# Altium PCB Mega2560_Custom.PcbDoc (part 2 of 6)
Units mil, origin at the board's own origin, x right, y up, seen from the top; angles counter-clockwise.
Board outline 4742.41 x 2889.95 mil, 2 copper layers (Top Layer, Bottom Layer), stack 57 mil thick; 215 components, 134 nets, 793 pads, 779 vias.
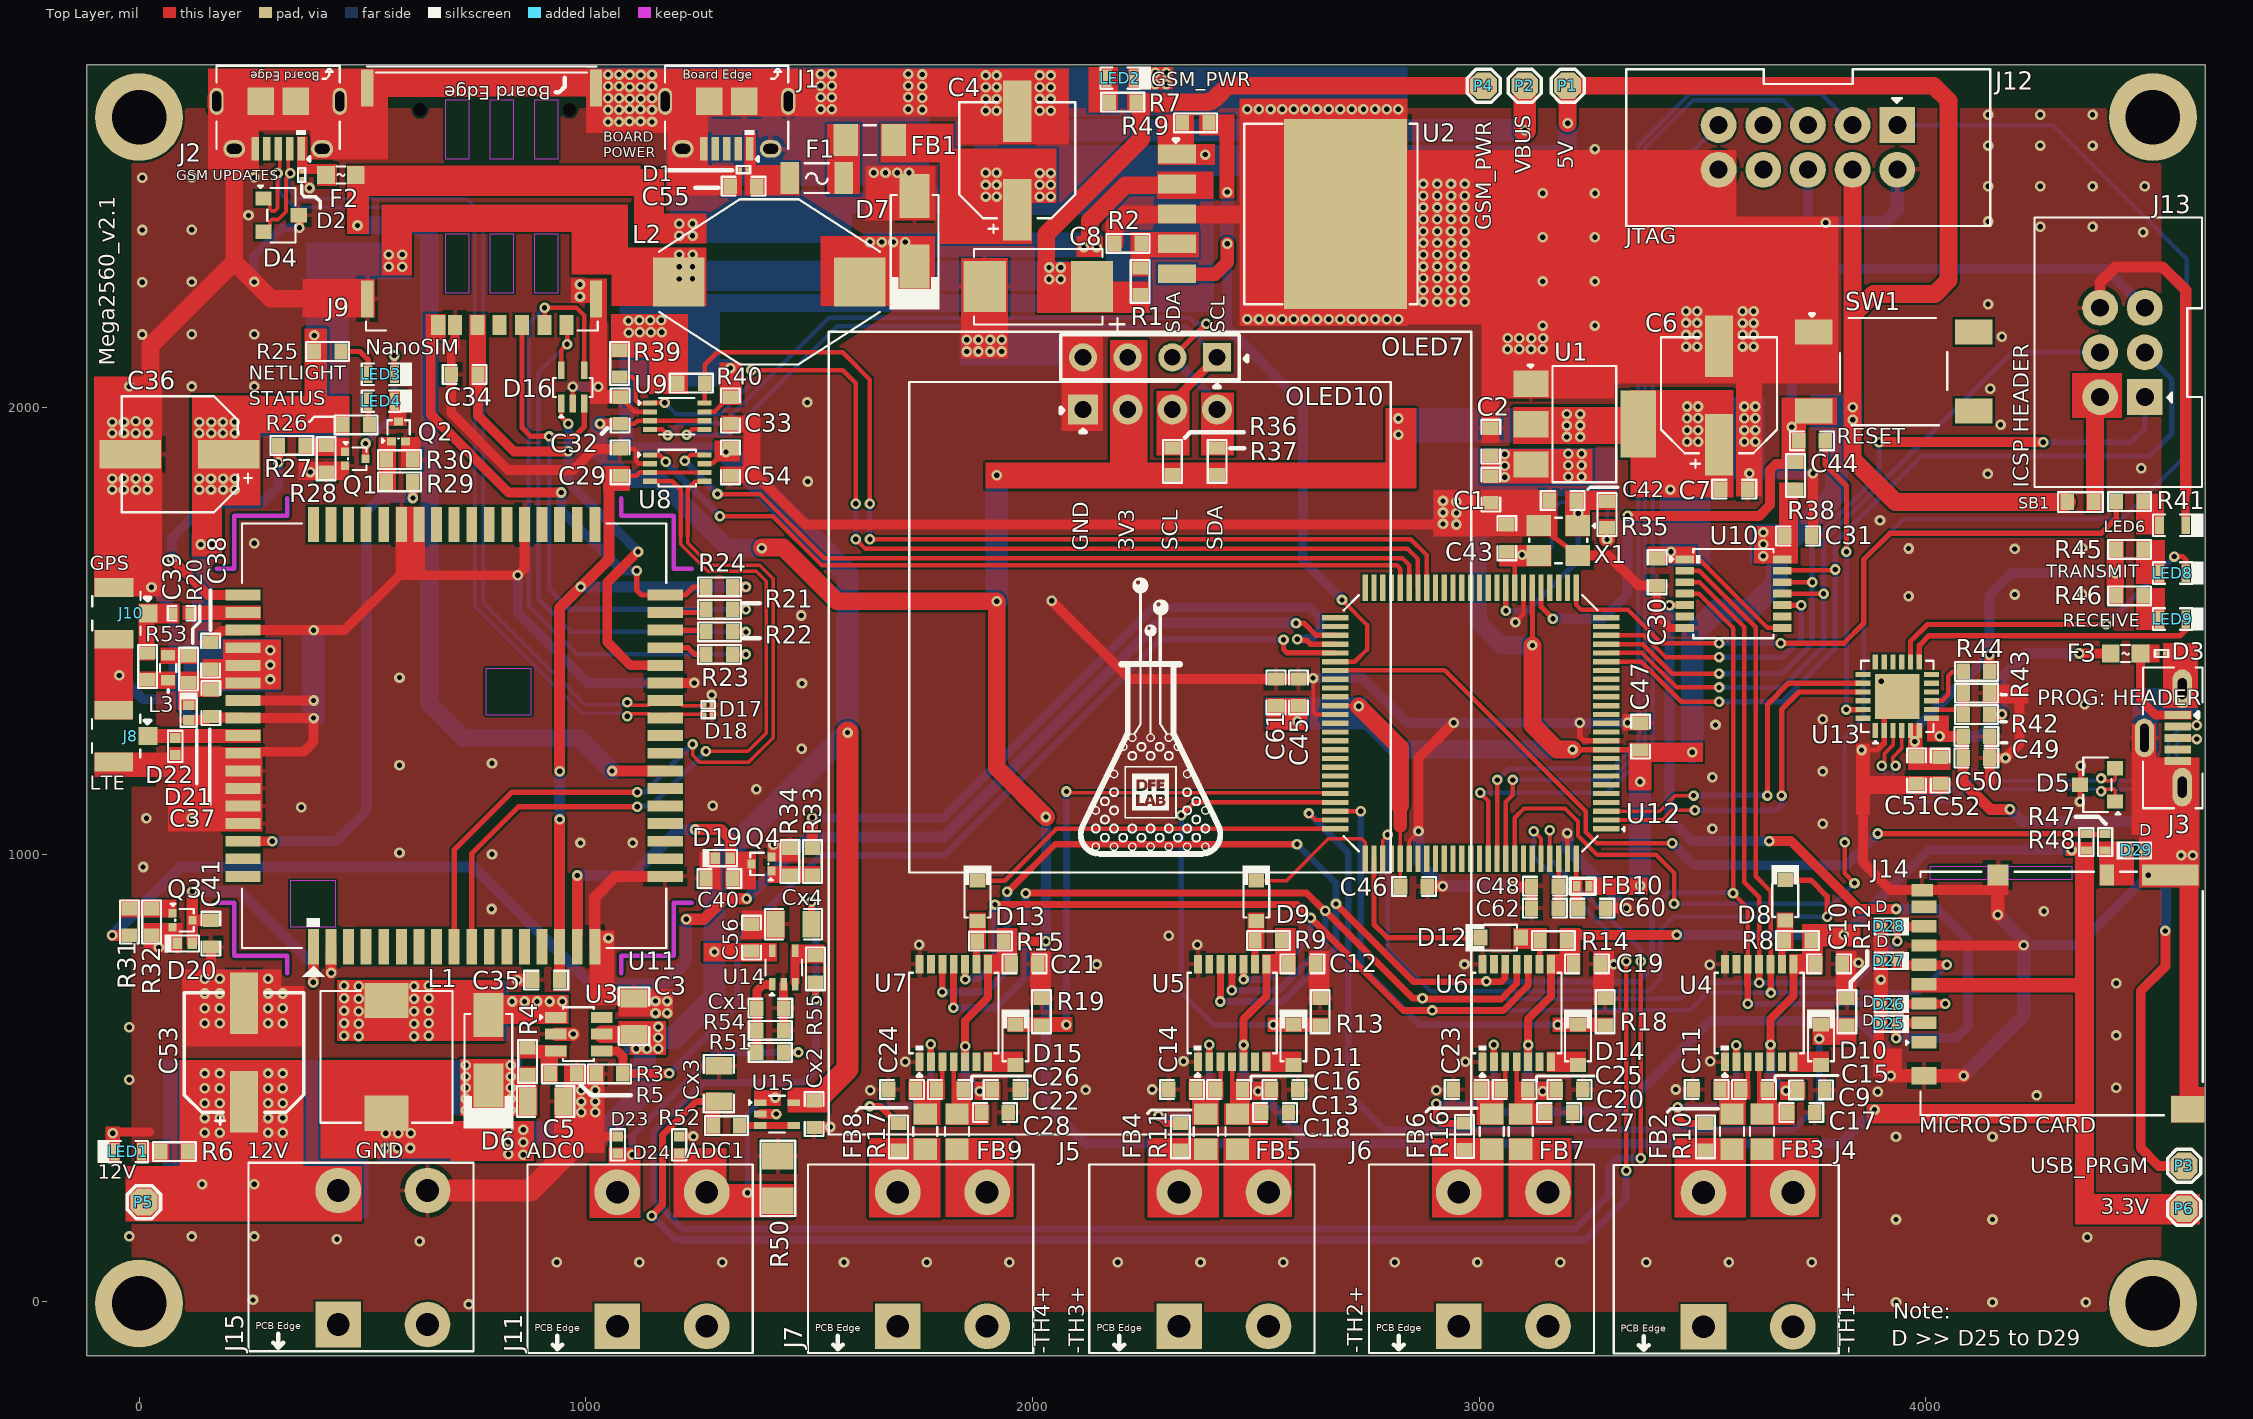
[diagram p0: Top Layer view]

## Part data (continued)
D8 D9 D10 D11 D12 D13 D14 D15: "DIODE GEN PURP 75V 150MA SOD323", Average Rectified Current=150mA, Capacitance=2pF, Forward Current=300mA, Forward Voltage=1.25V, LCSC Part Number=C60580, Manufacturer=Diodes, Max Forward Surge Current (Ifsm)=2A, Max Operating Temperature=150°C, Max Repetitive Reverse Voltage (Vrrm)=75V, Max Reverse Current=1uA, Min Operating Temperature=-65°C, Package Quantity=3000, Power Dissipation=200mW, Supplier Part Number 1=621-1N4148WS-F, Category="Rectifier Diodes", ComponentLink1Description=https://datasheet.ciiva.com/1179/ds30097-1179355.pdf?src-supplier=Element14, ComponentLink1URL=https://datasheet.ciiva.com/1179/ds30097-1179355.pdf?src-supplier=Element14, ComponentLink2Description=https://datasheet.ciiva.com/8300/ds30097-8300396.pdf?src-supplier=Avnet, ComponentLink2URL=https://datasheet.ciiva.com/8300/ds30097-8300396.pdf?src-supplier=Avnet, ComponentLink3Description=https://datasheet.ciiva.com/16199/ds30097-16199061.pdf?src-supplier=Future+Electronics, ComponentLink3URL=https://datasheet.ciiva.com/16199/ds30097-16199061.pdf?src-supplier=Future+Electronics, ComponentLink4Description=https://datasheet.ciiva.com/911/ds30097-911742.pdf?src-supplier=Digi-Key, ComponentLink4URL=https://datasheet.ciiva.com/911/ds30097-911742.pdf?src-supplier=Digi-Key, ComponentLink5Description=https://datasheet.ciiva.com/911/ds30097-911743.pdf?src-supplier=Digi-Key, ComponentLink5URL=https://datasheet.ciiva.com/911/ds30097-911743.pdf?src-supplier=Digi-Key, ComponentLink6Description=https://datasheet.ciiva.com/911/ds30097-911741.pdf?src-supplier=Digi-Key, ComponentLink6URL=https://datasheet.ciiva.com/911/ds30097-911741.pdf?src-supplier=Digi-Key, Contact Plating=Tin,Matte, Current Rating=150mA, Element Configuration=Single, Height=1mm, Item Type=Diode, Lead Free="Lead Free", Length=1.8mm, Manufacturer Part Number=1N4148WS-7-F, Max Reverse Voltage (DC)=75V, Max Surge Current=2A, Mount="Surface Mount", Number of Pins=2, Output Current=150mA, Packaging="Tape and Reel", Peak Non-Repetitive Surge Current=2A, Polarity=Standard, Power Rating=200mW, Pricing 1="1=0.19000, 10=0.17500, 50=0.17500, 100=0.09600, 500=0.05900, 1000=0.04000, 3000=0.03000, 9000=0.02600, 10000=0.02600, 24000=0.02300, 45000=0.01900 (USD)", Radiation Hardening=No, REACH SVHC="No SVHC", Recovery Time=4ns, Reverse Recovery Time=4ns, Reverse Recovery Time-Max=4ns, RoHS=Yes, RoHS Compliant=Yes, Series=-, Supplier 1=Mouser, Voltage=75V, Voltage Rating (DC)=75V, Weight=0.000173oz, Width=1.4mm
D16: "TVS DIODE 3VWM SOT3235", Breakdown Voltage=7.2V, Capacitance=90pF, Case/Package=SOT-323, LCSC Part Number=C48677, Leakage Current=1uA, Manufacturer=STMicroelectronics, Max Operating Temperature=125°C, Min Breakdown Voltage=6.1V, Min Operating Temperature=-40°C, Operating Supply Voltage=3V, Package Quantity=1, Peak Pulse Current=15A, Peak Pulse Power=150W, Power Line Protection=No, Resistor Type=Zener, Test Current=1mA, Category="TVS Diodes", ComponentLink1Description=https://datasheet.ciiva.com/15143/getdatasheetpartid-134557-15143650.pdf?src-supplier=Verical, ComponentLink1URL=https://datasheet.ciiva.com/15143/getdatasheetpartid-134557-15143650.pdf?src-supplier=Verical, ComponentLink2Description=https://datasheet.ciiva.com/1276/1671027-1276908.pdf?src-supplier=Element14, ComponentLink2URL=https://datasheet.ciiva.com/1276/1671027-1276908.pdf?src-supplier=Element14, ComponentLink3Description=https://datasheet.ciiva.com/22695/1671027-22695673.pdf?src-supplier=Element14, ComponentLink3URL=https://datasheet.ciiva.com/22695/1671027-22695673.pdf?src-supplier=Element14, ComponentLink4Description=https://datasheet.ciiva.com/338/cd00064033-338380.pdf?src-supplier=Digi-Key, ComponentLink4URL=https://datasheet.ciiva.com/338/cd00064033-338380.pdf?src-supplier=Digi-Key, ComponentLink5Description=https://datasheet.ciiva.com/338/cd00064033-338379.pdf?src-supplier=Digi-Key, ComponentLink5URL=https://datasheet.ciiva.com/338/cd00064033-338379.pdf?src-supplier=Digi-Key, ComponentLink6Description=https://datasheet.ciiva.com/338/cd00064033-338381.pdf?src-supplier=Digi-Key, ComponentLink6URL=https://datasheet.ciiva.com/338/cd00064033-338381.pdf?src-supplier=Digi-Key, ComponentLink7Description=https://datasheet.ciiva.com/41443/001184222-da-01-en-transil-array-da-esda6v1w5-sot-323-5-stm-41443642.pdf?src-supplier=Conrad, ComponentLink7URL=https://datasheet.ciiva.com/41443/001184222-da-01-en-transil-array-da-esda6v1w5-sot-323-5-stm-41443642.pdf?src-supplier=Conrad, Depth=1.35mm, Diode Type=ZENER, Direction=Unidirectional, Element Configuration="Common Anode", ESD Protection=Yes, Height=1mm, Item Type=Diode, Lead Free="Lead Free", Length=2.2mm, Manufacturer Part Number=ESDA6V1W5, Max Breakdown Voltage=7.2V, Max Reverse Leakage Current=1uA, Mount="Surface Mount", Number of Channels=4, Number of Elements=4, Number of Pins=5, Number of Unidirectional Channels=4, Packaging="Tape and Reel", Polarity=Unidirectional, Pricing 1="1=0.46690, 10=0.38770, 25=0.37260, 100=0.27930, 250=0.27650, 500=0.23480, 1000=0.21350, 3000=0.10000 (USD)", Radiation Hardening=No, Reach SVHC Compliant=Yes, Reverse Breakdown Voltage=6.1V, Reverse Standoff Voltage=3V, RoHS=Yes, RoHS Compliant=Yes, Series="ESDA, TRANSIL™", Stock 1=3304, Supplier 1="Arrow Electronics", Supplier Part Number 1=ESDA6V1W5, Termination=SMD/SMT, Voltage Rating (DC)=6.1V, Width=1.35mm, Working Voltage=3V
D19 D20 D21: "35A@8/20us 15V 4.5V@Max Unidirectional DFN1006 TVS ROHS", LCSC Part Number=C239784, Manufacturer="WILLSEMI(Will Semicon)", Package=DFN1006, ComponentLink1Description=LCSC, ComponentLink1URL=https://www.lcsc.com/product-detail/TVS_WILLSEMI-Will-Semicon-ESD5651N-2-TR_C239784.html, Item Type=Diode, Manufacturer Part Number=ESD5651N-2/TR
D22: "0402 TVS ROHS", LCSC Part Number=C5210978, Manufacturer=Leiditech, Package=0402, ComponentLink1Description=LCSC, ComponentLink1URL=https://www.lcsc.com/product-detail/TVS_Leiditech-LXES15AAA1-153_C5210978.html, Item Type="TVS Diode", Manufacturer Part Number=LXES15AAA1-153
D23 D24: "TVS DIODE 12VWM 250VC 0402", Capacitance=0.04pF, Case Code (Imperial)=0402, Case Code (Metric)=1005, Clamping Voltage=250V, LCSC Part Number=C10676, Leakage Current=1nA, Manufacturer=Littelfuse, Max Operating Temperature=125°C, Min Operating Temperature=-65°C, Operating Supply Voltage=12V, Power Line Protection=No, Resistor Type=Zener, Case/Package=0402, Category="TVS Diodes", ComponentLink1Description=https://datasheet.ciiva.com/1268/1486684-1268416.pdf?src-supplier=Element14, ComponentLink1URL=https://datasheet.ciiva.com/1268/1486684-1268416.pdf?src-supplier=Element14, ComponentLink2Description=https://datasheet.ciiva.com/5837/575761-5837954.pdf?src-supplier=Farnell, ComponentLink2URL=https://datasheet.ciiva.com/5837/575761-5837954.pdf?src-supplier=Farnell, ComponentLink3Description=https://datasheet.ciiva.com/11804/0900766b80f9ec73-11804302.pdf?src-supplier=RSComponents, ComponentLink3URL=https://datasheet.ciiva.com/11804/0900766b80f9ec73-11804302.pdf?src-supplier=RSComponents, ComponentLink4Description=https://datasheet.ciiva.com/1268/575761-1268268.pdf?src-supplier=Element14, ComponentLink4URL=https://datasheet.ciiva.com/1268/575761-1268268.pdf?src-supplier=Element14, ComponentLink5Description=https://datasheet.ciiva.com/331/littelfuse-pulseguard-esd-pgb1-331746.pdf?src-supplier=Digi-Key, ComponentLink5URL=https://datasheet.ciiva.com/331/littelfuse-pulseguard-esd-pgb1-331746.pdf?src-supplier=Digi-Key, ComponentLink6Description=https://datasheet.ciiva.com/331/littelfuse-pulseguard-esd-pgb1-331747.pdf?src-supplier=Digi-Key, ComponentLink6URL=https://datasheet.ciiva.com/331/littelfuse-pulseguard-esd-pgb1-331747.pdf?src-supplier=Digi-Key, ComponentLink7Description=https://datasheet.ciiva.com/331/littelfuse-pulseguard-esd-pgb1-331745.pdf?src-supplier=Digi-Key, ComponentLink7URL=https://datasheet.ciiva.com/331/littelfuse-pulseguard-esd-pgb1-331745.pdf?src-supplier=Digi-Key, ComponentLink8Description=https://datasheet.ciiva.com/26917/getdatasheetpartid-250436-26917930.pdf?src-supplier=Verical, ComponentLink8URL=https://datasheet.ciiva.com/26917/getdatasheetpartid-250436-26917930.pdf?src-supplier=Verical, Depth=0.51mm, Diode Type=ZENER, Direction=Bidirectional, Element Configuration=Single, Height=0.31mm, Item Type=Diode, Lead Free="Lead Free", Length=1.66mm, Manufacturer Part Number=PGB1010402KR, Mount="Surface Mount", Number of Bidirectional Channels=1, Number of Channels=1, Number of Elements=1, Number of Pins=2, Packaging="Cut Tape", Polarity=Bidirectional, Pricing 1="10000=0.23580, 20000=0.23350, 30000=0.23120, 40000=0.22890, 50000=0.21590, 100000=0.20590 (USD)", Radiation Hardening=No, Reach SVHC Compliant=Yes, Response Time=1ns, Reverse Standoff Voltage=12V, RoHS=Yes, RoHS Compliant=Yes, Series="PulseGuard® PGB", Stock 1=30000, Supplier 1="Arrow Electronics", Supplier Part Number 1=PGB1010402KR, Termination=SMD/SMT, Voltage Rating=12V, Voltage Rating (DC)=12V, Working Voltage=12V
D25 D26 D27 D28 D29: "DFN1006-2L ESD Protection Devices ROHS", LCSC Part Number=C239604, Manufacturer=WILLSEMI, ComponentLink1Description=LCSC, ComponentLink1URL=https://www.lcsc.com/product-detail/TVS_Will-Semicon-ESD5451N-2-TR_C239604.html, Manufacturer Part Number=ESD5451N-2/TR
F1: "PTC RESET FUSE 6V 3A 1206", Case Code (Imperial)=1206, Case Code (Metric)=3216, Hold Current=3A, LCSC Part Number=C207041, Manufacturer=Littelfuse, Max Current Rating=50A, Max Operating Temperature=85°C, Max Voltage Rating (DC)=6V, Min Operating Temperature=-40°C, Package Quantity=4000, Power Dissipation=800mW, Resistance=20mR, Trip Current=6A, Approvals=UL,TUV, Case/Package=1206, Category="PTC Resettable Fuses", ComponentLink1Description=https://datasheet.ciiva.com/7438/littelfuse-lorho-ptc-7438567.pdf?src-supplier=Digi-Key, ComponentLink1URL=https://datasheet.ciiva.com/7438/littelfuse-lorho-ptc-7438567.pdf?src-supplier=Digi-Key, ComponentLink2Description=https://datasheet.ciiva.com/7438/littelfuse-lorho-ptc-7438569.pdf?src-supplier=Digi-Key, ComponentLink2URL=https://datasheet.ciiva.com/7438/littelfuse-lorho-ptc-7438569.pdf?src-supplier=Digi-Key, ComponentLink3Description=https://datasheet.ciiva.com/7438/littelfuse-lorho-ptc-7438565.pdf?src-supplier=Digi-Key, ComponentLink3URL=https://datasheet.ciiva.com/7438/littelfuse-lorho-ptc-7438565.pdf?src-supplier=Digi-Key, Item Type=Fuse, Lead Free="Lead Free", Manufacturer Part Number=1206L300SLTHYR, Operating Supply Voltage=6V, Packaging="Tape and Reel", Pricing 1="4000=0.60290 (USD)", RoHS=Yes, RoHS Compliant=Yes, Series="POLY-FUSE®, LoRho™", Stock 1=4000, Supplier 1="Arrow Electronics", Supplier Part Number 1=1206L300SLTHYR, Termination=SMD/SMT, Time to Trip=4s, Voltage Rating (DC)=6V
F2 F3: "6V 500mA 40A 1A 0603 Resettable Fuses ROHS", Manufacturer=TECHFUSE, Supplier Part Number 1=C69679, Category=Uncategorized, Manufacturer Part Number=SMD0603-050, RoHS=No, Supplier 1=LCSC
FB1: library part BLM31PG121SN1L, "FERRITE BEAD 120 OHM 1206 1LN", Case Code (Imperial)=1206, Case Code (Metric)=3216, Current Rating=3.5A, DC Current=3A, DC Resistance (DCR)=20mR, LCSC Part Number=C85841, Manufacturer=Murata, Max Operating Temperature=125°C, Min Operating Temperature=-55°C, Package Quantity=3000, Tolerance=25%, Case/Package=1206, Category="Ferrite Beads and Chips", ComponentLink1Description=https://datasheet.ciiva.com/19460/1845419-19460234.pdf?src-supplier=Jameco, ComponentLink1URL=https://datasheet.ciiva.com/19460/1845419-19460234.pdf?src-supplier=Jameco, ComponentLink2Description=https://datasheet.ciiva.com/1012/l0132s0193blm31p-1012992.pdf?src-supplier=Digi-Key, ComponentLink2URL=https://datasheet.ciiva.com/1012/l0132s0193blm31p-1012992.pdf?src-supplier=Digi-Key, ComponentLink3Description=https://datasheet.ciiva.com/11799/0900766b811b5866-11799444.pdf?src-supplier=RSComponents, ComponentLink3URL=https://datasheet.ciiva.com/11799/0900766b811b5866-11799444.pdf?src-supplier=RSComponents, ComponentLink4Description=https://datasheet.ciiva.com/3081/l0110s0100blm31p-3081665.pdf?src-supplier=Avnet, ComponentLink4URL=https://datasheet.ciiva.com/3081/l0110s0100blm31p-3081665.pdf?src-supplier=Avnet, ComponentLink5Description=https://datasheet.ciiva.com/41449/001172383-da-01-en-drossel-1206-120r-3-2x1-60mm-3000st-41449554.pdf?src-supplier=Conrad, ComponentLink5URL=https://datasheet.ciiva.com/41449/001172383-da-01-en-drossel-1206-120r-3-2x1-60mm-3000st-41449554.pdf?src-supplier=Conrad, ComponentLink6Description=https://datasheet.ciiva.com/29348/442557-da-01-en-chip-drossel-1206-120r-3000ma-3-2x1-60mm-29348014.pdf?src-supplier=Conrad, ComponentLink6URL=https://datasheet.ciiva.com/29348/442557-da-01-en-chip-drossel-1206-120r-3000ma-3-2x1-60mm-29348014.pdf?src-supplier=Conrad, ComponentLink7Description=https://datasheet.ciiva.com/14122/apblm31p-data-e-14122856.pdf?src-supplier=Distrelec, ComponentLink7URL=https://datasheet.ciiva.com/14122/apblm31p-data-e-14122856.pdf?src-supplier=Distrelec, ComponentLink8Description=https://datasheet.ciiva.com/48436/blm31pg121sn1l-eng-tds-48436731.pdf?src-supplier=Distrelec, ComponentLink8URL=https://datasheet.ciiva.com/48436/blm31pg121sn1l-eng-tds-48436731.pdf?src-supplier=Distrelec, ComponentLink9Description=https://datasheet.ciiva.com/1012/l0110s0100blm31p-1012991.pdf?src-supplier=Digi-Key, ComponentLink9URL=https://datasheet.ciiva.com/1012/l0110s0100blm31p-1012991.pdf?src-supplier=Digi-Key, ComponentLink10Description=https://datasheet.ciiva.com/1012/l0110s0100blm31p-1012993.pdf?src-supplier=Digi-Key, ComponentLink10URL=https://datasheet.ciiva.com/1012/l0110s0100blm31p-1012993.pdf?src-supplier=Digi-Key, ComponentLink11Description=https://datasheet.ciiva.com/3081/l0110s0100blm31p-3081666.pdf?src-supplier=Avnet, ComponentLink11URL=https://datasheet.ciiva.com/3081/l0110s0100blm31p-3081666.pdf?src-supplier=Avnet, ComponentLink12Description=https://datasheet.ciiva.com/16390/l0110s0100blm31p-16390857.pdf?src-supplier=Future+Electronics, ComponentLink12URL=https://datasheet.ciiva.com/16390/l0110s0100blm31p-16390857.pdf?src-supplier=Future+Electronics, ComponentLink13Description=https://datasheet.ciiva.com/18093/getdatasheetpartid-152966-18093084.pdf?src-supplier=Verical, ComponentLink13URL=https://datasheet.ciiva.com/18093/getdatasheetpartid-152966-18093084.pdf?src-supplier=Verical, Contact Plating=Tin,Matte, Core Material=Ferrite, Depth=1.6mm, Frequency=100MHz, Height=1.1mm, Impedance=120R, Item Type="Ferrite Bead", Lead Free="Lead Free", Length=3.2mm, Manufacturer Part Number=BLM31PG121SN1L, Material=Steel,Ferrite, Max Current Rating=3.5A, Max DC Current=3A, Military Standard=Not, Number of Lines=1, Number of Pins=2, Packaging="Tape and Reel", Pricing 1="3000=0.11563, 6000=0.10938, 12000=0.10313, 18000=0.09688, 24000=0.09063, 30000=0.08438, 300000=0.07813 (USD)", Radiation Hardening=No, RoHS=Yes, RoHS Compliant=Yes, Shielding=Unshielded, Stock 1=290640, Supplier 1=Avnet, Supplier Part Number 1=BLM31PG121SN1L, Termination=SMD/SMT, Test Frequency=100MHz, Width=1.6mm
FB2 FB3 FB4 FB5 FB6 FB7 FB8 FB9: "FERRITE BEAD 1K OHM 0805 1LN", Case Code (Imperial)=0805, Case Code (Metric)=2012, DC Resistance (DCR)=300mR, LCSC Part Number=C307765, Manufacturer=TDK, Max Current Rating=500mA, Max Operating Temperature=125°C, Min Operating Temperature=-55°C, Package Quantity=4000, Ratings=AEC-Q200, Supplier Part Number 1=445-MMZ2012R102ATD25CT-ND, Test Frequency=100MHz, Tolerance=25%, Case/Package=0805, Category="Ferrite Beads and Chips", ComponentLink1Description=http://www.mouser.com/ds/2/400/beads_automotive_signal_mmz_en-469244.pdf?src-supplier=Mouser, ComponentLink1URL=http://www.mouser.com/ds/2/400/beads_automotive_signal_mmz_en-469244.pdf?src-supplier=Mouser, ComponentLink2Description=https://product.tdk.com/info/en/catalog/datasheets/beads_automotive_signal_mmz2012_en.pdf?src-supplier=Digi-Key, ComponentLink2URL=https://product.tdk.com/info/en/catalog/datasheets/beads_automotive_signal_mmz2012_en.pdf?src-supplier=Digi-Key, Height=0.041inch, Impedance=1kR, Item Type="Ferrite Bead", Length=0.079inch, Manufacturer Part Number=MMZ2012R102ATD25, Max DC Current=500mA, Mount="Surface Mount", Number of Lines=1, Packaging="Tape and Reel", Pricing 1="1=0.11000, 10=0.09200, 25=0.08280, 50=0.06080, 100=0.05240, 250=0.04140, 500=0.03496, 1000=0.02944 (USD)", RoHS=Yes, RoHS Compliant=Yes, Stock 1=2942, Supplier 1=Digi-Key, Termination=SMD/SMT, Weight=0.000194oz, Width=0.049inch
FB10: "FERRITE BEAD 120 OHM 0402 1LN", Case Code (Imperial)=0402, Case Code (Metric)=1005, Current Rating=1.3A, DC Resistance (DCR)=90mR, LCSC Part Number=C76891, Manufacturer=Murata, Max Operating Temperature=125°C, Min Operating Temperature=-55°C, Package Quantity=1, Test Frequency=100MHz, Tolerance=25%, Case/Package=0402, Category="Ferrite Beads and Chips", ComponentLink1Description=https://datasheet.ciiva.com/11800/0900766b811b5866-11800860.pdf?src-supplier=RSComponents, ComponentLink1URL=https://datasheet.ciiva.com/11800/0900766b811b5866-11800860.pdf?src-supplier=RSComponents, ComponentLink2Description=https://datasheet.ciiva.com/18093/getdatasheetpartid-195858-18093157.pdf?src-supplier=Verical, ComponentLink2URL=https://datasheet.ciiva.com/18093/getdatasheetpartid-195858-18093157.pdf?src-supplier=Verical, ComponentLink3Description=https://datasheet.ciiva.com/41425/001171686-da-01-en-chip-drossel0402-120r-1300ma-1-0x0-5mm-41425776.pdf?src-supplier=Conrad, ComponentLink3URL=https://datasheet.ciiva.com/41425/001171686-da-01-en-chip-drossel0402-120r-1300ma-1-0x0-5mm-41425776.pdf?src-supplier=Conrad, ComponentLink4Description=https://datasheet.ciiva.com/41449/001172205-da-01-en-drossel-0402-120r-11-0x0-5mm-10000st-41449495.pdf?src-supplier=Conrad, ComponentLink4URL=https://datasheet.ciiva.com/41449/001172205-da-01-en-drossel-0402-120r-11-0x0-5mm-10000st-41449495.pdf?src-supplier=Conrad, ComponentLink5Description=https://datasheet.ciiva.com/1012/l0110e-1012435.pdf?src-supplier=Digi-Key, ComponentLink5URL=https://datasheet.ciiva.com/1012/l0110e-1012435.pdf?src-supplier=Digi-Key, ComponentLink6Description=https://datasheet.ciiva.com/1012/l0110e-1012434.pdf?src-supplier=Digi-Key, ComponentLink6URL=https://datasheet.ciiva.com/1012/l0110e-1012434.pdf?src-supplier=Digi-Key, ComponentLink7Description=https://datasheet.ciiva.com/1012/l0110e-1012436.pdf?src-supplier=Digi-Key, ComponentLink7URL=https://datasheet.ciiva.com/1012/l0110e-1012436.pdf?src-supplier=Digi-Key, Core Material=Ferrite, DC Current=1.3A, DC Resistance-Max=90mR, Depth=0.55mm, Height=0.5mm, Impedance=120R, Item Type="Ferrite Bead", Lead Free="Lead Free", Length=1mm, Manufacturer Part Number=BLM15PD121SN1D, Material=Steel,Ferrite, Max Current Rating=1.3A, Max DC Current=1.3A, Military Standard=Not, Number of Circuits=1, Number of Lines=1, Number of Pins=2, Packaging="Tape and Reel", Pricing 1="10000=0.03238, 20000=0.03063, 40000=0.02888, 60000=0.02713, 80000=0.02538, 100000=0.02363, 1000000=0.02188 (USD)", Radiation Hardening=No, Reach SVHC Compliant=Yes, RoHS=Yes, RoHS Compliant=Yes, Series=BLM15PD, Stock 1=300000, Supplier 1=Avnet, Supplier Part Number 1=BLM15PD121SN1D, Termination=SMD/SMT, Width=0.5mm
J1 J2: "CONN RCPT USB2.0 MICRO B SMD R/A", Color=Black, Current Rating=1.8A, Flammability Rating="UL94 V-0", Insulation Resistance=1GR, LCSC Part Number=C132563, Manufacturer="Amphenol FCI", Max Operating Temperature=85°C, Max Voltage Rating (AC)=100V, Min Operating Temperature=-55°C, Package Quantity=9600, Supplier Part Number 1=609-4618-1-ND, ComponentLink1Description=http://www.amphenol-icc.com/media/wysiwyg/files/drawing/10118194.pdf?src-supplier=Digi-Key, ComponentLink1URL=http://www.amphenol-icc.com/media/wysiwyg/files/drawing/10118194.pdf?src-supplier=Digi-Key, ComponentLink2Description=https://cdn.amphenol-icc.com/media/wysiwyg/files/drawing/10118194.pdf?src-supplier=Mouser, ComponentLink2URL=https://cdn.amphenol-icc.com/media/wysiwyg/files/drawing/10118194.pdf?src-supplier=Mouser, ComponentLink3Description=https://cdn.amphenol-icc.com/media/wysiwyg/files/drawing/10118194.pdf?src-supplier=Verical, ComponentLink3URL=https://cdn.amphenol-icc.com/media/wysiwyg/files/drawing/10118194.pdf?src-supplier=Verical, Connector Type=USB,Receptacle, Contact Material="Copper Alloy", Contact Plating=Gold, Depth=5mm, Features=Shielded, Gender=Receptacle, Housing Material=Polymer, Item Type="USB Connector", Lead Free="Lead Free", Length=8.05mm, Manufacturer Part Number=10118194-0001LF, Mount="Surface Mount,Horizontal", Number of Contacts=5, Number of Ports=1, Number of Terminals=5, Orientation="Right Angle", Packaging="Tape and Reel", Pitch=0.65mm, Pricing 1="1=0.43, 10=0.405, 25=0.3648, 50=0.3242, 100=0.3107, 250=0.28368, 500=0.27016 (USD)", Radiation Hardening=No, Stock 1=35943, Supplier 1=Digi-Key, Termination=Solder
J3: "CONN RCPT USB2.0 MICRO B SMD", Contact Resistance=30mR, Dielectric Withstanding Voltage (AC)=140V, Flammability Rating="UL94 V-0", Insulation Resistance=1GR, LCSC Part Number=C586226, Manufacturer=Molex, Max Operating Temperature=85°C, Min Operating Temperature=-30°C, Rated Current (Signal)=1A, Body Breadth=0.118inch, Body Depth=0.264inch, Body Length=0.315inch, Category="USB Connectors", ComponentLink1Description=https://datasheet.ciiva.com:443/pdfs/VipMasterIC/IC/MOLE/MOLE-S-A0000025294/MOLE-S-A0000025294-1.pdf?src-supplier=IHS+Markit, ComponentLink1URL=https://datasheet.ciiva.com:443/pdfs/VipMasterIC/IC/MOLE/MOLE-S-A0000025294/MOLE-S-A0000025294-1.pdf?src-supplier=IHS+Markit, ComponentLink2Description=https://datasheet.ciiva.com/29660/1051330011-sd-29660273.pdf?src-supplier=Digi-Key, ComponentLink2URL=https://datasheet.ciiva.com/29660/1051330011-sd-29660273.pdf?src-supplier=Digi-Key, ComponentLink3Description=https://datasheet.ciiva.com/15181/getdatasheetpartid-719072-15181485.pdf?src-supplier=Verical, ComponentLink3URL=https://datasheet.ciiva.com/15181/getdatasheetpartid-719072-15181485.pdf?src-supplier=Verical, Connector Type="TELECOM AND DATACOM CONNECTOR", Contact Finish - Mating="NOT SPECIFIED", Contact Finish - Termination="Gold (Au) - with Nickel (Ni) barrier", Contact Gender=Female, Contact Material="Copper Alloy", Contact Style=USB, DIN Conformance=No, Durability=10000Cycles, Empty Shell=No, Filter Feature=No, IEC Conformance=No, Insulation Material=Polyethylene, Item Type="USB Connector", JESD-609 Code=e4, Manufacturer Part Number=105133-0011, MIL Conformance=No, Mixed Contacts=No, Mounting Option 1=LOCKING, Mounting Style=STRAIGHT, Mounting Technology=Board, Number Of Connectors=1, Number of Contacts=5, Number Of PCB Rows=1, Option="General Purpose", PCB Contact Pattern=RECTANGULAR, Polarization Key="POLARIZED HOUSING", Pricing 1="500=1.01170 (USD)", Reach SVHC Compliant=Yes, Reference Standard=UL, Reliability=COMMERCIAL, RoHS=Yes, RoHS Compliant=Yes, Shell Finish=Tin, Shell Material="Stainless Steel", Stock 1=12800, Supplier 1=Avnet, Supplier Part Number 1=105133-0011, Terminal Pitch=0.6604mm, Termination=SMD/SMT
J4 J5 J6 J7 J11 J15: "TERM BLK 2POS TOP ENT 5.08MM PCB", LCSC Part Number=C967080, Manufacturer=Amphenol, ComponentLink1Description=https://datasheet.ciiva.com:443/pdfs/VipMasterIC/IC/AMPH/AMPH-S-A0005047712/AMPH-S-A0005047712-1.pdf?src-supplier=IHS+Markit, ComponentLink1URL=https://datasheet.ciiva.com:443/pdfs/VipMasterIC/IC/AMPH/AMPH-S-A0005047712/AMPH-S-A0005047712-1.pdf?src-supplier=IHS+Markit, Item Type="Terminal Block", Manufacturer Part Number=HA0200500000G, Pricing 1="2160=0.34600, 2520=0.34400, 3600=0.29460, 9000=0.29270, 18000=0.29070, 45000=0.28890, 90000=0.28680 (USD)", Reach SVHC Compliant=Yes, RoHS=Yes, RoHS Compliant=Yes, Stock 1=120, Supplier 1="Arrow Electronics", Supplier Part Number 1=HA0200500000G, Terminal and Terminal Block Type="BARRIER STRIP TERMINAL BLOCK"
J8 J10: "CONN U.FL RCPT STR 50 OHM SMD", Case/Package=SMD/SMT, LCSC Part Number=C88374, Manufacturer=Hirose, Package Quantity=10000, Supplier Part Number 1=U.FL-R-SMT-1(80)-CUTT, ComponentLink1Description=https://www.hirose.com/product/en/download_file/key_name/U.FL-R-SMT-1%2880%29/category/Specification%20Sheet/doc_file_id/37638/?file_category_id=9&item_id=03310472280&is_series=&src-supplier=Digi-Key, ComponentLink1URL=https://www.hirose.com/product/en/download_file/key_name/U.FL-R-SMT-1%2880%29/category/Specification%20Sheet/doc_file_id/37638/?file_category_id=9&item_id=03310472280&is_series=&src-supplier=Digi-Key, ComponentLink2Description=http://www.mouser.com/ds/2/185/U.FL_catalog-939761.pdf?src-supplier=Mouser, ComponentLink2URL=http://www.mouser.com/ds/2/185/U.FL_catalog-939761.pdf?src-supplier=Mouser, Lead Free="Lead Free", Manufacturer Part Number=U.FL-R-SMT-1(80), Packaging="Tape and Reel", Pricing 1="1=1.07, 500=0.785, 1500=0.74, 2500=0.72, 5000=0.695 (USD)", Stock 1=1272, Supplier 1="Future Electronics"
J9: "Copper Alloy Self bomb Gold plating 1.25mm Deck -40℃~+85℃ 260℃ NanoSIM SMD SIM Card Connectors ROHS", LCSC Part Number=C381071, Manufacturer="XKB Connectivity", Package="SMD Custom", ComponentLink1Description=LCSC, ComponentLink1URL=https://www.lcsc.com/product-detail/SIM-Card-Connectors_XKB-Connectivity-XKNANO-113_C381071.html, Item Type="SIM Card Connectors", Manufacturer Part Number=XKNANO-113
J12: "2.54mm -40℃~+105℃ Straight 3A 250V 5 Push - Pull 2.54mm 2 Plugin,P=2.54mm IDC Connectors ROHS", LCSC Part Number=C492442, Manufacturer=XFCN, Manufacturer Part Number=BH254V-10P, Package=Plugin,P=2.54mm, ComponentLink1Description=LCSC, ComponentLink1URL=https://www.lcsc.com/product-detail/IDC-Connectors_XFCN-BH254V-10P_C492442.html, Item Type=Connector
J13: library part "BH254V-6P ( 6-ICSP 2.54mm)", "2.54mm -40℃~+105℃ Straight 3A 250V 3 Push - Pull 2.54mm 2 Plugin,P=2.54mm IDC Connectors ROHS", LCSC Part Number=C492441, Manufacturer=XFCN, Manufacturer Part Number=BH254V-6P, Package=Plugin,P=2.54mm, ComponentLink1Description=LCSC, ComponentLink1URL=*https://www.lcsc.com/product-detail/IDC-Connectors_XFCN-BH254V-6P_C492441.html, Item Type=Connector
J14: "CONN MICRO SD CARD PUSH-PUSH R/A", Contact Resistance=100mR, Current Rating=500mA, Flammability Rating="UL94 V-0", Insulation Resistance=1GR, LCSC Part Number=C597972, Manufacturer=Hirose, Max Operating Temperature=85°C, Max Voltage Rating (AC)=125V, Min Operating Temperature=-25°C, Package Quantity=1, Supplier Part Number 1=3000978, Category="Memory Connectors", ComponentLink1Description=https://datasheet.ciiva.com/683/doc-1806131255093-683387.pdf?src-supplier=Digi-Key, ComponentLink1URL=https://datasheet.ciiva.com/683/doc-1806131255093-683387.pdf?src-supplier=Digi-Key, Connector Type=Connector,Socket, Contact Material="Copper Alloy,Copper", Contact Plating=Gold, Depth=1.83mm, Gender=Female, Housing Material=Polymer, Item Type="SD Card Connector", Lead Free="Lead Free", Length=13.85mm, Manufacturer Part Number=DM3BT-DSF-PEJS, Max Current Rating=500mA, Mount="Surface Mount,Reverse", Number of Contacts=8, Number of Positions=8, Number of Rows=1, Orientation="Right Angle", Packaging="Tape and Reel", Pitch=1.1mm, Pricing 1="1200=1.39000 (USD)", Radiation Hardening=No, Reach SVHC Compliant=Yes, RoHS=Yes, RoHS Compliant=Yes, Series=DM3, Stock 1=9600, Supplier 1="Future Electronics", Termination=Solder, Voltage Rating (AC)=125V, Width=16.05mm
L1: library part SMRH74-220MT, "22uH ±20% SMD Power Inductors ROHS", LCSC Part Number=C27442, Manufacturer="SXN(Shun Xiang Nuo Elec)", Package=Custom, ComponentLink1Description=LCSC, ComponentLink1URL=https://www.lcsc.com/product-detail/Power-Inductors_SXN-Shun-Xiang-Nuo-Elec-SMRH74-220MT_C27442.html, Item Type=Inductor, Manufacturer Part Number=SMRH74-220MT
L2: library part SSL0804T-220M-N, "2.6A 22uH ±20% 0.085Ω 2.6A SMD,12.95x9.4x5.21mm Power Inductors ROHS", LCSC Part Number=C108312, Manufacturer="Chilisin Elec", Package=SMD,12.95x9.4x5.21mm, ComponentLink1Description=LCSC, ComponentLink1URL=https://www.lcsc.com/product-detail/Power-Inductors_Chilisin-Elec-SSL0804T-220M-N_C108312.html, Item Type=Inductor, Manufacturer Part Number=SSL0804T-220M-N
L3: library part LQW18AN27NG10D, "FIXED IND 27NH 590MA 116MOHM SMD", Case Code (Imperial)=0603, Case Code (Metric)=1608, Current Rating=590mA, DC Resistance (DCR)=116mR, Inductance Tolerance=2%, LCSC Part Number=C701182, Manufacturer=Murata, Max Operating Temperature=125°C, Min Operating Temperature=-55°C, Package Quantity=1, Resistor Type=Wirewound, Self Resonant Frequency=2.8GHz, Test Frequency=100MHz, Case/Package=0603, Category="Fixed Inductors", ComponentLink1Description=https://datasheet.ciiva.com/11799/0900766b80a002db-11799175.pdf?src-supplier=RSComponents, ComponentLink1URL=https://datasheet.ciiva.com/11799/0900766b80a002db-11799175.pdf?src-supplier=RSComponents, ComponentLink2Description=https://datasheet.ciiva.com/6705/l0075s0080lqw18a-10-6705574.pdf?src-supplier=Digi-Key, ComponentLink2URL=https://datasheet.ciiva.com/6705/l0075s0080lqw18a-10-6705574.pdf?src-supplier=Digi-Key, ComponentLink3Description=https://datasheet.ciiva.com/8507/l0075s0080lqw18a-10-8507510.pdf?src-supplier=Avnet, ComponentLink3URL=https://datasheet.ciiva.com/8507/l0075s0080lqw18a-10-8507510.pdf?src-supplier=Avnet, ComponentLink4Description=https://datasheet.ciiva.com/4978/product-4978252.pdf?src-supplier=Mouser, ComponentLink4URL=https://datasheet.ciiva.com/4978/product-4978252.pdf?src-supplier=Mouser, Core Material=Non-Magnetic, DC Current=590mA, Depth=1.1mm, Height=0.8mm, Height - Seated (Max)=0.039inch, Inductance=27nH, Item Type=Inductor, Lead Free="Lead Free", Length=1.6mm, Manufacturer Part Number=LQW18AN27NG10D, Max DC Current=590mA, Military Standard=Not, Mount="Surface Mount", Packaging="Tape and Reel", Pricing 1="1=0.17550, 10=0.13260, 25=0.13120, 100=0.10470, 250=0.09530, 500=0.08580, 1000=0.07160, 3000=0.06500 (USD)", Q Factor=42, Radiation Hardening=No, Reach SVHC Compliant=Yes, RoHS=Yes, RoHS Compliant=Yes, Series=LQW18A_10, Shielding=Unshielded, Stock 1=3528, Supplier 1="Arrow Electronics", Supplier Part Number 1=LQW18AN27NG10D, Termination=SMD/SMT, Tolerance=2%, Weight=0.000106oz, Width=0.031inch
LED1 LED2 LED3: library part 19-21/R7C-AK1L2BY/3T, "Red 632nm LED Indication - Discrete 2.05V 0603 (1608 Metric)", LCSC Part Number=C1322287, Manufacturer="Everlight Elec", Package=0603, ComponentLink1Description=LCSC, ComponentLink1URL=https://www.lcsc.com/product-detail/Light-Emitting-Diodes-LED_Everlight-Elec-19-21-R7C-AK1L2BY-3T_C1322287.html, Item Type=LED, Manufacturer Part Number=19-21/R7C-AK1L2BY/3T
LED4 LED6 LED8 LED9: library part 19-21/G6C-FM1N2B/3T, "Yellow-Green 572nm LED Indication - Discrete 2.05V 0603 (1608 Metric)", LCSC Part Number=C93689, Manufacturer="Everlight Elec", Package=0603, ComponentLink1Description=LCSC, ComponentLink1URL=https://www.lcsc.com/product-detail/Light-Emitting-Diodes-LED_Everlight-Elec-19-21-G6C-FM1N2B-3T_C93689.html, Item Type=LED, Manufacturer Part Number=19-21/G6C-FM1N2B/3T
OLED7: library part ZIO-101954, "ZIO QWIIC 1.5INCH OLED DISPLAY", Manufacturer="Smart Prototyping", Package=Custom, ComponentLink1Description=Digikey, ComponentLink1URL=https://www.digikey.com/en/products/detail/smart-prototyping/ZIO-101954/14565832, Item Type="OLED Module", Manufacturer Part Number=ZIO-101954
OLED10: "0.96 Inch OLED SSD1306 White/Blue/Yellow 128X64 IIC I2C Serial Display Module 12864 LCD Screen Board For Arduino", Manufacturer="TENSTAR ROBOT", Package=Custom, ComponentLink1Description=Aliexpress, ComponentLink1URL=https://vi.aliexpress.com/item/32643950109.html?gatewayAdapt=glo2vnm, Item Type="OLED Module", Manufacturer Part Number="OLED 0.96\" inch i2C"
P1 P2 P3 P4 P5 P6: "Test Point ON"
Q1 Q2 Q3 Q4: "40V 100mW 100@10mA,1V 200mA 300MHz 300mV@50mA,5mA NPN -55℃~+150℃@(Tj) SOT-723 Bipolar Transistors - BJT ROHS", LCSC Part Number=C2923360, Manufacturer="TECH PUBLIC", Package=SOT-723, ComponentLink1Description=LCSC, ComponentLink1URL=https://www.lcsc.com/product-detail/Bipolar-Transistors-BJT_TECH-PUBLIC-MMBT3904M_C2923360.html, Item Type=Mosfet, Manufacturer Part Number=MMBT3904M
R1: library part RT0603BRD072K1L, "RES SMD 2.1K OHM 0.1% 1/10W 0603", Case Code (Imperial)=0603, Case Code (Metric)=1608, LCSC Part Number=C861293, Manufacturer=Yageo, Max Operating Temperature=125°C, Max Power Dissipation=100mW, Min Operating Temperature=-55°C, Resistance=2.1kR, Resistor Type="Thin Film", Temperature Coefficient=25ppm/°C, Tolerance=0.1%, Voltage Rating=75V, Voltage Rating (DC)=50V, Case/Package=0603, Category="Chip SMD Resistors", ComponentLink1Description=https://datasheet.ciiva.com/12723/pyu-rt-1-to-0-05-rohs-l-4-12723880.pdf?src-supplier=Mouser, ComponentLink1URL=https://datasheet.ciiva.com/12723/pyu-rt-1-to-0-05-rohs-l-4-12723880.pdf?src-supplier=Mouser, Construction=Rectangular, Depth=0.8mm, Features="Moisture Resistant", Height=0.022inch, Item Type=Resistor, Lead Free="Lead Free", Length=0.063inch, Manufacturer Part Number=RT0603BRD072K1L, Military Standard=Not, Number of Terminations=2, Packaging="Tape and Reel", Power Rating=100mW, Pricing 1="1=0.32000, 10=0.26320, 25=0.26040, 100=0.10310, 250=0.10280, 500=0.10180, 1000=0.06110, 3000=0.03900 (USD)", RoHS=Yes, RoHS Compliant=Yes, Series=RT, Stock 1=4891, Supplier 1="Arrow Electronics", Supplier Part Number 1=RT0603BRD072K1L, Termination=SMD/SMT, Width=0.031inch
R2: library part RT0603BRD071KL, "RES SMD 1K OHM 0.1% 1/10W 0603", Case Code (Imperial)=0603, Case Code (Metric)=1608, LCSC Part Number=C110776, Manufacturer=Yageo, Max Operating Temperature=125°C, Max Power Dissipation=100mW, Min Operating Temperature=-55°C, Package Quantity=5000, Resistance=1kR, Resistor Type="Thin Film", Temperature Coefficient=25ppm/°C, Voltage Rating=75V, Voltage Rating (DC)=50V, Case/Package=0603, Category="Chip SMD Resistors", ComponentLink1Description=https://datasheet.ciiva.com/11819/0900766b8079c86e-11819652.pdf?src-supplier=RSComponents, ComponentLink1URL=https://datasheet.ciiva.com/11819/0900766b8079c86e-11819652.pdf?src-supplier=RSComponents, ComponentLink2Description=https://datasheet.ciiva.com/5624/pyu-rt-1-to-0-05-rohs-l-4-5624759.pdf?src-supplier=Mouser, ComponentLink2URL=https://datasheet.ciiva.com/5624/pyu-rt-1-to-0-05-rohs-l-4-5624759.pdf?src-supplier=Mouser, ComponentLink3Description=https://datasheet.ciiva.com/29718/pyu-rt-1-to-0-05-rohs-l-4-29718010.pdf?src-supplier=Digi-Key, ComponentLink3URL=https://datasheet.ciiva.com/29718/pyu-rt-1-to-0-05-rohs-l-4-29718010.pdf?src-supplier=Digi-Key, ComponentLink4Description=https://datasheet.ciiva.com/29718/pyu-rt-1-to-0-05-rohs-l-4-29718011.pdf?src-supplier=Digi-Key, ComponentLink4URL=https://datasheet.ciiva.com/29718/pyu-rt-1-to-0-05-rohs-l-4-29718011.pdf?src-supplier=Digi-Key, Construction=Rectangular, Contact Plating=Tin,Lead, Depth=0.8mm, Features="Moisture Resistant", Height=0.022inch, Item Type=Resistor, Lead Free="Lead Free", Length=1.6mm, Manufacturer Part Number=RT0603BRD071KL, Military Standard=Not, Mount="Surface Mount", Number of Terminations=2, Packaging="Tape and Reel", Power Rating=100mW, Pricing 1="5000=0.03900, 10000=0.03450, 25000=0.03070, 50000=0.02040 (USD)", RoHS=Yes, RoHS Compliant=Yes, Series=RT, Size Code=0603, Stock 1=130000, Supplier 1="Arrow Electronics", Supplier Part Number 1=RT0603BRD071KL, Technology="THIN FILM", Termination=SMD/SMT, Width=0.031inch
R3 R8 R9 R12 R13 R14 R15 R18 R19 R24 R38 R39 R40 R49: library part RC0603FR-0710KL, "RES SMD 10K Ohm 1% 1/10W 0603", Case Code (Imperial)=0603, Case Code (Metric)=1608, LCSC Part Number=C98220, Manufacturer=Yageo, Max Operating Temperature=155°C, Max Power Dissipation=100mW, Min Operating Temperature=-55°C, Resistance=10kR, Resistance Tolerance=1%, Resistor Type="Thick Film", Supplier Part Number 1=311-10.0KHRCT-ND, Temperature Coefficient=100ppm/°C, Voltage Rating=75V, Voltage Rating (DC)=50V, Case/Package=0603, Category="Chip SMD Resistors", ComponentLink1Description=https://datasheet.ciiva.com/7660/38590-7660789.pdf?src-supplier=Element14, ComponentLink1URL=https://datasheet.ciiva.com/7660/38590-7660789.pdf?src-supplier=Element14, ComponentLink2Description=https://datasheet.ciiva.com/7983/443971-7983596.pdf?src-supplier=Element14, ComponentLink2URL=https://datasheet.ciiva.com/7983/443971-7983596.pdf?src-supplier=Element14, ComponentLink3Description=https://datasheet.ciiva.com/22747/443971-22747519.pdf?src-supplier=Element14, ComponentLink3URL=https://datasheet.ciiva.com/22747/443971-22747519.pdf?src-supplier=Element14, ComponentLink4Description=https://datasheet.ciiva.com/46440/1868787-46440891.pdf?src-supplier=Element14, ComponentLink4URL=https://datasheet.ciiva.com/46440/1868787-46440891.pdf?src-supplier=Element14, ComponentLink5Description=https://datasheet.ciiva.com/7746/1738695-7746239.pdf?src-supplier=Element14, ComponentLink5URL=https://datasheet.ciiva.com/7746/1738695-7746239.pdf?src-supplier=Element14, ComponentLink6Description=https://datasheet.ciiva.com/15189/getdatasheetpartid-409289-15189591.pdf?src-supplier=Verical, ComponentLink6URL=https://datasheet.ciiva.com/15189/getdatasheetpartid-409289-15189591.pdf?src-supplier=Verical, Construction=Rectangular, Depth=0.8mm, Features="Moisture Resistant", Height=0.45mm, Lead Free="Lead Free", Lead Pitch=0.3mm, Length=1.6mm, Manufacturer Part Number=RC0603FR-0710KL, Military Standard=Not, Number of Pins=2, Number of Terminations=2, Packaging="Tape and Reel", Power Rating=100mW, Pricing 1="1=0.10000, 10=0.02400, 100=0.00970, 1000=0.00436, 2500=0.00378 (USD)", REACH SVHC=Unknown, RoHS=Yes, RoHS Compliant=Yes, Series=RC, Size Code=0603, Stock 1=25249139, Supplier 1=Digi-Key, Termination=SMD/SMT, Tolerance=1%, Weight=7.1E-05oz, Width=0.8mm
  R3 R49: Item Type=Resistor
R4: library part RT0603BRD0762KL, "RES SMD 62K OHM 0.1% 1/10W 0603", Case Code (Imperial)=0603, Case Code (Metric)=1608, LCSC Part Number=C136961, Manufacturer=Yageo, Max Operating Temperature=125°C, Max Power Dissipation=100mW, Min Operating Temperature=-55°C, Package Quantity=5000, Resistance=62kR, Resistor Type="Thin Film", Supplier Part Number 1=YAG1707CT-ND, Temperature Coefficient=25ppm/°C, Tolerance=0.1%, Voltage Rating=75V, Voltage Rating (DC)=50V, Case/Package=0603, Category="Chip SMD Resistors", ComponentLink1Description=https://datasheet.ciiva.com/8888/pyu-rt-1-to-0-05-rohs-l-4-8888573.pdf?src-supplier=Avnet, ComponentLink1URL=https://datasheet.ciiva.com/8888/pyu-rt-1-to-0-05-rohs-l-4-8888573.pdf?src-supplier=Avnet, ComponentLink2Description=https://datasheet.ciiva.com/2586/pyu-rt-1-to-0-05-rohs-l-4-2586028.pdf?src-supplier=Digi-Key, ComponentLink2URL=https://datasheet.ciiva.com/2586/pyu-rt-1-to-0-05-rohs-l-4-2586028.pdf?src-supplier=Digi-Key, ComponentLink3Description=https://datasheet.ciiva.com/46635/pyu-rt-1-to-0-05-rohs-l-5-46635035.pdf?src-supplier=Digi-Key, ComponentLink3URL=https://datasheet.ciiva.com/46635/pyu-rt-1-to-0-05-rohs-l-5-46635035.pdf?src-supplier=Digi-Key, Construction=Rectangular, Contact Plating=Tin,Matte, Depth=0.8mm, Features="Moisture Resistant", Height=0.022inch, Item Type=Resistor, Lead Free="Lead Free", Length=1.6mm, Manufacturer Part Number=RT0603BRD0762KL, Military Standard=Not, Number of Terminations=2, Packaging="Tape and Reel", Power Rating=100mW, Pricing 1="1=0.34000, 10=0.28800, 100=0.11260, 500=0.06812, 1000=0.04716, 2500=0.04322 (USD)", Radiation Hardening=No, RoHS=Yes, RoHS Compliant=Yes, Series=RT, Stock 1=20000, Supplier 1=Digi-Key, Termination=SMD/SMT, Weight=7.1E-05oz, Width=0.8mm
R5: library part RT0603BRD073K16L, "RES SMD 3.16KOHM 0.1% 1/10W 0603", Case Code (Imperial)=0603, Case Code (Metric)=1608, LCSC Part Number=C861373, Manufacturer=Yageo, Max Operating Temperature=125°C, Max Power Dissipation=100mW, Min Operating Temperature=-55°C, Package Quantity=5000, Resistance=3.16kR, Resistor Type="Thin Film", Temperature Coefficient=25ppm/°C, Tolerance=0.1%, Voltage Rating=75V, Voltage Rating (DC)=50V, Case/Package=0603, Category="Chip SMD Resistors", ComponentLink1Description=https://datasheet.ciiva.com/2585/pyu-rt-1-to-0-05-rohs-l-5-2585923.pdf?src-supplier=Digi-Key, ComponentLink1URL=https://datasheet.ciiva.com/2585/pyu-rt-1-to-0-05-rohs-l-5-2585923.pdf?src-supplier=Digi-Key, Construction=Rectangular, Depth=0.8mm, Height=0.022inch, Item Type=Resistor, Lead Free="Lead Free", Length=0.063inch, Manufacturer Part Number=RT0603BRD073K16L, Military Standard=Not, Number of Terminations=2, Packaging="Tape and Reel", Power Rating=100mW, Pricing 1="1=0.31330, 10=0.25380, 25=0.25120, 100=0.09580, 250=0.09480, 500=0.09380, 1000=0.05630, 3000=0.03310 (USD)", RoHS=Yes, RoHS Compliant=Yes, Series=RT, Stock 1=4487, Supplier 1="Arrow Electronics", Supplier Part Number 1=RT0603BRD073K16L, Termination=SMD/SMT, Width=0.031inch
R6 R44: library part RC0603FR-071K2L, "RES SMD 1.2K OHM 1% 1/10W 0603", Case Code (Imperial)=0603, Case Code (Metric)=1608, LCSC Part Number=C114605, Manufacturer=Yageo, Max Operating Temperature=155°C, Max Power Dissipation=100mW, Min Operating Temperature=-55°C, Resistance=1.2kR, Resistance Tolerance=1%, Resistor Type="Thick Film", Supplier Part Number 1=311-1.20KHRCT-ND, Temperature Coefficient=100ppm/°C, Voltage Rating=50V, Case/Package=0603, Category="Chip SMD Resistors", Construction=Rectangular, Depth=0.8mm, Features="Moisture Resistant", Height=0.45mm, Lead Free="Lead Free", Length=1.6mm, Manufacturer Part Number=RC0603FR-071K2L, Military Standard=Not, Number of Pins=2, Number of Terminations=2, Packaging="Tape and Reel", Power Rating=100mW, Pricing 1="1=0.10000, 10=0.02400, 100=0.00970, 1000=0.00436, 2500=0.00378 (USD)", REACH SVHC="No SVHC", RoHS=Yes, RoHS Compliant=Yes, Series=RC, Size Code=0603, Stock 1=531140, Supplier 1=Digi-Key, Termination=SMD/SMT, Tolerance=1%, Voltage Rating (DC)=50V, Width=0.8mm
  R6: Item Type=Resistor
R7 R25 R26: library part RC0603FR-07180RL, "RES 180 OHM 1% 1/10W 0603", Case Code (Imperial)=0603, Case Code (Metric)=1608, LCSC Part Number=C137786, Manufacturer=Yageo, Max Operating Temperature=155°C, Max Power Dissipation=100mW, Min Operating Temperature=-55°C, Package Quantity=1, Resistance Tolerance=1%, Resistor Type="Thick Film", Temperature Coefficient=100ppm/°C, Voltage Rating=50V, Case/Package=0603, Category="Chip SMD Resistors", ComponentLink1Description=https://datasheet.ciiva.com/2454/pyu-r-int-thick-7-2454469.pdf?src-supplier=Digi-Key, ComponentLink1URL=https://datasheet.ciiva.com/2454/pyu-r-int-thick-7-2454469.pdf?src-supplier=Digi-Key, ComponentLink2Description=https://datasheet.ciiva.com/2454/pyu-r-int-thick-7-2454470.pdf?src-supplier=Digi-Key, ComponentLink2URL=https://datasheet.ciiva.com/2454/pyu-r-int-thick-7-2454470.pdf?src-supplier=Digi-Key, ComponentLink3Description=https://datasheet.ciiva.com/2454/pyu-r-int-thick-7-2454468.pdf?src-supplier=Digi-Key, ComponentLink3URL=https://datasheet.ciiva.com/2454/pyu-r-int-thick-7-2454468.pdf?src-supplier=Digi-Key, ComponentLink4Description=https://datasheet.ciiva.com/7746/443971-7746267.pdf?src-supplier=Element14, ComponentLink4URL=https://datasheet.ciiva.com/7746/443971-7746267.pdf?src-supplier=Element14, ComponentLink5Description=https://datasheet.ciiva.com/7746/443971-7746266.pdf?src-supplier=Element14, ComponentLink5URL=https://datasheet.ciiva.com/7746/443971-7746266.pdf?src-supplier=Element14, ComponentLink6Description=https://datasheet.ciiva.com/15189/getdatasheetpartid-325160-15189622.pdf?src-supplier=Verical, ComponentLink6URL=https://datasheet.ciiva.com/15189/getdatasheetpartid-325160-15189622.pdf?src-supplier=Verical, Construction=Rectangular, Depth=0.8mm, Features="Moisture Resistant", Height=0.022inch, Item Type=Resistor, Lead Free="Lead Free", Length=1.6mm, Manufacturer Part Number=RC0603FR-07180RL, Military Standard=Not, Number of Pins=2, Number of Terminations=2, Packaging="Tape and Reel", Power Rating=100mW, Pricing 1="5000=0.00133, 10000=0.00131, 20000=0.00127 (USD)", Resistance=180R, RoHS=Yes, RoHS Compliant=Yes, Series=RC, Size Code=0603, Stock 1=35000, Supplier 1=Avnet, Supplier Part Number 1=RC0603FR-07180RL, Termination=SMD/SMT, Tolerance=1%, Voltage Rating (DC)=50V, Width=0.8mm
R10 R11 R16 R17: library part RT0603BRE072KL, "RES SMD 2K OHM 0.1% 1/10W 0603", Case Code (Imperial)=0603, Case Code (Metric)=1608, LCSC Part Number=C136954, Manufacturer=Yageo, Max Operating Temperature=155°C, Max Power Dissipation=100mW, Min Operating Temperature=-55°C, Package Quantity=5000, Resistance=2kR, Resistor Type="Thin Film", Supplier Part Number 1=8298309, Temperature Coefficient=50ppm/°C, Tolerance=0.1%, Voltage Rating (DC)=50V, Case/Package=0603, Category="Chip SMD Resistors", ComponentLink1Description=https://datasheet.ciiva.com/2584/pyu-rt-1-to-0-05-rohs-l-5-2584417.pdf?src-supplier=Digi-Key, ComponentLink1URL=https://datasheet.ciiva.com/2584/pyu-rt-1-to-0-05-rohs-l-5-2584417.pdf?src-supplier=Digi-Key, Construction=Rectangular, Depth=0.8mm, Features="Moisture Resistant", Height=0.022inch, Item Type=Resistor, Lead Free="Lead Free", Length=0.063inch, Manufacturer Part Number=RT0603BRE072KL, Military Standard=Not, Number of Terminations=2, Packaging="Tape and Reel", Power Rating=100mW, Pricing 1="5000=0.03240, 15000=0.03120, 20000=0.03090, 50000=0.02990, 75000=0.02900 (USD)", RoHS=Yes, RoHS Compliant=Yes, Series=RT, Size Code=0603, Stock 1=85000, Supplier 1="Future Electronics", Width=0.031inch
R20: library part RC0603FR-0710RL, "RES SMD 10 OHM 1% 1/10W 0603", Case Code (Imperial)=0603, Case Code (Metric)=1608, LCSC Part Number=C109318, Manufacturer=Yageo, Max Operating Temperature=155°C, Min Operating Temperature=-55°C, Power Rating=100mW, Supplier Part Number 1=311-10.0HRDKR-ND, Temperature Coefficient=200ppm/°C, Tolerance=1%, Voltage Rating=50V, Case/Package=0603, ComponentLink1Description=http://www.farnell.com/datasheets/1868787.pdf?src-supplier=Element14, ComponentLink1URL=http://www.farnell.com/datasheets/1868787.pdf?src-supplier=Element14, ComponentLink2Description=http://www.yageo.com/documents/recent/PYu-RC0603_51_RoHS_L_4.pdf?src-supplier=Avnet, ComponentLink2URL=http://www.yageo.com/documents/recent/PYu-RC0603_51_RoHS_L_4.pdf?src-supplier=Avnet, ComponentLink3Description=http://documents.rs-components.com/techlib://itc_doclist_GB.htm?stockno=5048984&src-supplier=RSComponents, ComponentLink3URL=http://documents.rs-components.com/techlib://itc_doclist_GB.htm?stockno=5048984&src-supplier=RSComponents, ComponentLink4Description=http://www.yageo.com/documents/recent/PYu-RC0603_51_RoHS_L_4.pdf?src-supplier=Avnet+Europe, ComponentLink4URL=http://www.yageo.com/documents/recent/PYu-RC0603_51_RoHS_L_4.pdf?src-supplier=Avnet+Europe, Composition="Thick Film", Contact Plating=Tin,Matte, Depth=0.8mm, Height=0.45mm, Lead Free="Lead Free", Length=1.6mm, Manufacturer Part Number=RC0603FR-0710RL, Military Standard=Not, Number of Pins=2, Packaging="Tape and Reel", Pricing 1="1=0.1, 10=0.046, 100=0.0187, 1000=0.0084, 2500=0.00729 (USD)", Radiation Hardening=No, REACH SVHC="No SVHC", Resistance=10R, Stock 1=10836596, Supplier 1=Digi-Key, Termination=SMD/SMT, Voltage Rating (DC)=50V, Width=0.8mm
R21 R22 R23: library part RC0603FR-0722RL, "RES 22 OHM 1% 1/10W 0603", Case Code (Imperial)=0603, Case Code (Metric)=1608, LCSC Part Number=C107701, Manufacturer=Yageo, Max Operating Temperature=155°C, Max Power Dissipation=100mW, Min Operating Temperature=-55°C, Package Quantity=1, Resistance Tolerance=1%, Resistor Type="Thick Film", Temperature Coefficient=100ppm/°C, Voltage Rating=50V, Case/Package=0603, Category="Chip SMD Resistors", ComponentLink1Description=https://datasheet.ciiva.com/11819/0900766b80f96399-11819285.pdf?src-supplier=RSComponents, ComponentLink1URL=https://datasheet.ciiva.com/11819/0900766b80f96399-11819285.pdf?src-supplier=RSComponents, ComponentLink2Description=https://datasheet.ciiva.com/46395/443971-46395032.pdf?src-supplier=Element14, ComponentLink2URL=https://datasheet.ciiva.com/46395/443971-46395032.pdf?src-supplier=Element14, ComponentLink3Description=https://datasheet.ciiva.com/46440/1868787-46440901.pdf?src-supplier=Element14, ComponentLink3URL=https://datasheet.ciiva.com/46440/1868787-46440901.pdf?src-supplier=Element14, ComponentLink4Description=https://datasheet.ciiva.com/2454/pyu-r-int-thick-7-2454355.pdf?src-supplier=Digi-Key, ComponentLink4URL=https://datasheet.ciiva.com/2454/pyu-r-int-thick-7-2454355.pdf?src-supplier=Digi-Key, ComponentLink5Description=https://datasheet.ciiva.com/2454/pyu-r-int-thick-7-2454356.pdf?src-supplier=Digi-Key, ComponentLink5URL=https://datasheet.ciiva.com/2454/pyu-r-int-thick-7-2454356.pdf?src-supplier=Digi-Key, ComponentLink6Description=https://datasheet.ciiva.com/2454/pyu-r-int-thick-7-2454354.pdf?src-supplier=Digi-Key, ComponentLink6URL=https://datasheet.ciiva.com/2454/pyu-r-int-thick-7-2454354.pdf?src-supplier=Digi-Key, Construction=Rectangular, Depth=0.8mm, Features="Moisture Resistant", Height=0.022inch, Item Type=Resistor, Lead Free="Lead Free", Length=0.063inch, Manufacturer Part Number=RC0603FR-0722RL, Military Standard=Not, Number of Pins=2, Number of Terminations=2, Packaging="Tape and Reel", Power Rating=100mW, Pricing 1="5000=0.00133, 10000=0.00131, 20000=0.00127 (USD)", Reach SVHC Compliant=Yes, Resistance=22R, RoHS=Yes, RoHS Compliant=Yes, Series=RC, Size Code=0603, Stock 1=190000, Supplier 1=Avnet, Supplier Part Number 1=RC0603FR-0722RL, Technology="THICK FILM", Termination=SMD/SMT, Tolerance=1%, Voltage Rating (DC)=50V, Width=0.031inch